# Altium PCB WIFI_BoardV4.10.PcbDoc (part 4 of 4)
Units mil, origin at the board's own origin, x right, y up, seen from the top; angles counter-clockwise.
Board outline 5550.17 x 2342.16 mil, 2 copper layers (Top Layer, Bottom Layer), stack 61.811 mil thick; 125 components, 90 nets, 434 pads, 155 vias.
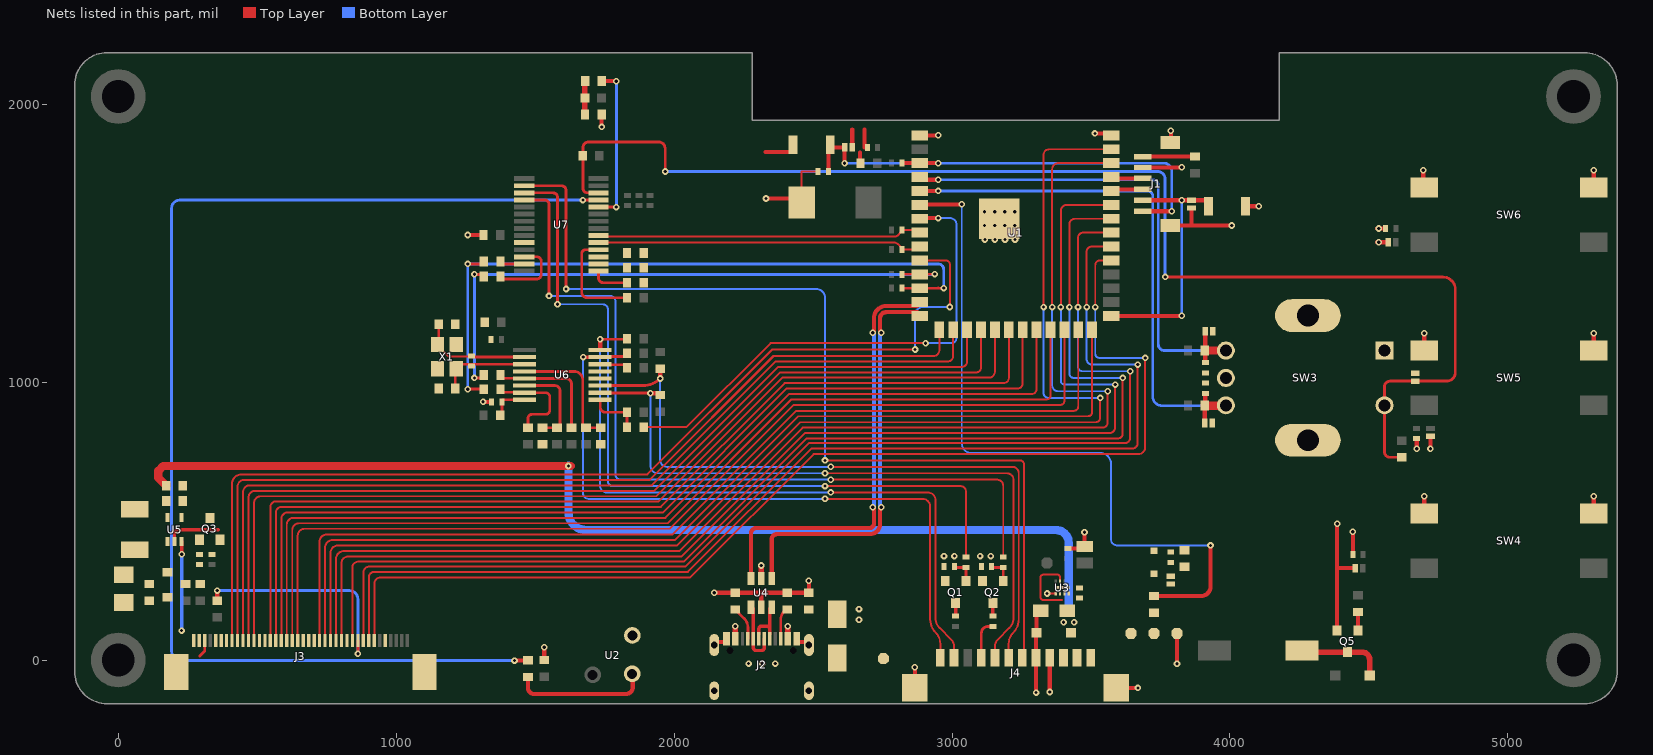
[diagram p2: the nets of this part, all layers, seen from the top]

## Via types
v1: diameter 23.62, hole 11.81, Top Layer to Bottom Layer, tented both sides, 155 vias

## Nets (pads, with @x,y where several pads share a name; then routed paths per layer and width w, separated by ;. In a path a pad name is that pad's centre, name@x,y a point inside that pad or via, vN(x,y) a via of type N, cw(c..) or ccw(c..) an arc to the next point about the centre after c; other vN are vias at no path point) (continued)
ENC_CHA: C1.2 D13.2 R3.1 SW3.A U1.4 | length 1887.1
  Top Layer w10: R3.1@3911.4,1111.83 R3.1@3911.4,1113.78
  Top Layer w15: U1.4@2884.64,1737.71 2894.64,1727.71 v1(2950.47,1727.71) ; C1.2@3911.4,1069.97 R3.1@3911.4,1111.83 ; R3.1@3911.4,1113.78 D13.2@3911.4,1182.61
  Top Layer w30: R3.1@3911.4,1113.78 SW3.A@3985.35,1113.78
  Bottom Layer w10: v1(2950.47,1727.71) 3721.36,1727.71 cw(c3721.36,1706.78) 3742.29,1706.78 3742.29,1135.88 ccw(c3764.77,1135.88) 3764.77,1113.4 SW3.A@3985.3,1113.4
ENC_CHB: C6.2 D12.2 R53.2 SW3.B U1.5 | length 2033.6
  Top Layer w15: U1.5@2884.64,1687.71 v1(2950.47,1687.71) ; D12.2@3909.4,853 3909.4,914.97 3911.35,916.93 C6.2@3911.35,958.79
  Top Layer w30: R53.2@3909.4,914.97 SW3.B@3985.3,914.97
  Bottom Layer w10: v1(2950.47,1687.71) 3703.68,1687.71 cw(c3703.68,1669.28) 3722.12,1669.28 3722.12,948.45 ccw(c3755.59,948.45) 3755.59,914.97 SW3.B@3985.3,914.97
ENC_SW: D14.2 R2.2 R54.1 SW3.2 U7.26 | length 4742.1
  Top Layer w10: U7.26@1728.35,1680.91 1688.71,1680.91 cw(c1688.71,1697.64) 1671.97,1697.64 1671.97,1843.38 cw(c1692.6,1843.38) 1692.6,1864 1944.73,1864 cw(c1944.73,1840.73) 1968,1840.73 v1(1968,1757.71) ; v1@3766.83,1378 4766,1378 cw(c4766,1333) 4811,1333 4811,1035 cw(c4779.54,1035) 4779.54,1003.54 D14.2@4667.01,1003.54 4576,1003.54 ccw(c4576,983.71) 4556.17,983.71 SW3.2@4556.17,916.55 4556.17,748.91 ccw(c4575.57,748.91) 4575.57,729.5 R54.1@4618.07,729.5
  Bottom Layer w10: v1(1968,1757.71) 3739.83,1757.71 cw(c3739.83,1730.71) 3766.83,1730.71 v1(3766.83,1378.36)
ESP_EN: C5.2 D4.2 J1.6 R1.1 SW1.1 U1.3 | length 1767.3
  Top Layer w15: C5.2@2555.36,1758 2555.36,1827.8 2561.99,1827.8 cw(c2578.72,1827.8) 2578.72,1844.53 D4.2@2613.43,1844.53 v1(2613.43,1787.71) ; R1.1@2819.99,1787.71 U1.3@2884.64,1787.71 v1(2950.47,1787.71) ; J1.6@3685.99,1614.57 v1(3790.64,1614.57)
  Bottom Layer w10: v1(2613.43,1787.71) v1(2950.47,1787.71) 3761.66,1787.71 cw(c3761.66,1758.73) 3790.64,1758.73 v1(3790.64,1614.57)
ESP_IO0: D8.2 J1.5 SW2.1 U1.27 | length 903.8
  Top Layer w15: U1.27@3573.61,1237.71 3574.18,1238.29 v1@3826.47,1238.29 ; J1.5@3685.99,1653.94 v1(3826.47,1653.94) D8.2@3861.48,1653.94 SW2.1@3921.56,1653.94
  Bottom Layer w10: v1(3826.47,1238.86) v1(3826.47,1653.94)
ESP_RXD0: J1.4 U1.36 | length 115.6
  Top Layer w15: U1.36@3573.61,1687.71 cw(c3579.21,1687.71) 3579.21,1693.31 J1.4@3685.99,1693.31
ESP_RXD1: J4.2 R25.1 U6.16 | length 2493.5
  Top Layer w7: v1(2564,603) 2913.23,603 cw(c2913.23,576) 2940.23,576 2940.23,151.46 ccw(c2990.94,151.46) 2955.08,115.6 2997.15,73.54 cw(c2973.19,49.57) 3007.08,49.57 J4.2@3007.08,8.31
  Top Layer w10: v1(1733.76,1154.23) R25.1@1830.52,1154.23
  Top Layer w15: U6.16@1734.17,1117.01 v1@1734.17,1153.82
  Bottom Layer w7: v1@1734,1159.03 1734,625.07 ccw(c1756.07,625.07) 1756.07,603 v1(2564,603)
ESP_RXD2: J4.6 R37.1 U6.11 | length 2557.9
  Top Layer w7: v1(2564,695) 3217.18,695 cw(c3217.18,672) 3240.18,672 3240.18,146.14 cw(c3173.53,146.14) 3220.66,99.01 ccw(c3261.05,58.62) 3203.93,58.62 J4.6@3203.93,8.31
  Top Layer w10: U6.11@1734.17,987.37 1888.13,987.37 ccw(c1888.13,1074.87) 1938.7,1003.46 ccw(c1888.13,1074.87) v1(1950,1013) ; R37.1@1950,1036.5 R37.1@1961.33,1047.83
  Top Layer w15: v1(1950,1013) R37.1@1950,1048.21
  Bottom Layer w7: v1(1950,1013) 1950,720.02 ccw(c1975.02,720.02) 1975.02,695 v1(2564,695)
ESP_TXD0: J1.3 U1.37 | length 115.3
  Top Layer w15: U1.37@3573.61,1737.71 ccw(c3578.64,1737.71) 3578.64,1732.68 J1.3@3685.99,1732.68
ESP_TXD1: J4.1 R29.2 U6.15 | length 2484.8
  Top Layer w7: v1(2543,580) 2893.14,580 cw(c2893.14,551.52) 2921.62,551.52 2921.61,146.14 ccw(c2988.26,146.14) 2941.13,99.01 cw(c2900.75,58.62) 2957.86,58.62 J4.1@2957.86,8.31
  Top Layer w10: v1(1672.89,1090) v1@1673.01,1089.87 ; U6.15@1734.04,1089.87 U6.15@1734.17,1089.74 1736.04,1091.61 1820.52,1091.61 1830.52,1101.61 R29.2@1830.52,1103.72
  Top Layer w13: v1@1673.01,1089.87 U6.15@1734.04,1089.87
  Bottom Layer w7: v1@1673,1090 v1(1672.89,1090) 1672.77,1090 1672.77,599.15 ccw(c1691.92,599.15) 1691.92,580 v1(2543,580)
ESP_TXD2: J4.5 R50.2 U6.10 | length 2479.9
  Top Layer w7: v1(2543,672) 3197.06,672 cw(c3197.06,647.5) 3221.56,647.5 3221.56,151.46 cw(c3170.85,151.46) 3206.71,115.6 3164.64,73.54 ccw(c3188.61,49.57) 3154.71,49.57 J4.5@3154.71,8.31
  Top Layer w10: U6.10@1734.17,961.78 1735.06,960.89 1914.11,960.89 v1(1915,960) ; R50.2@1943.38,960 R50.2@1950,953.38
  Top Layer w15: v1(1915,960) R50.2@1943.38,960
  Bottom Layer w7: v1(1915,960) 1915,698.21 ccw(c1941.21,698.21) 1941.21,672 v1(2543,672)
GND: C1.1 C2.2 C3.1 C4.1 C5.1 C6.1 C7.2 C8.1 C9.2 C10.1 C11.1 C12.1 C13.1 C14.1 C15.1 C16.2 C17.1 C18.1 C19.1 C20.1 C21.1 C22.1 C23.1 C24.2 C25.1 C26.1 D2.1 D4.1 D5.1 D6.1 D7.1 D8.1 D9.1 D10.1 D12.1 D13.1 D14.1 J1.2 J1.MP1 J1.MP2 J2.A1/B12 J2.B1/A12 J2.S1 J2.S2 J2.S3 J2.S4 J3.3 J3.5 J3.6 J3.7 J3.13 J3.14 J3.21 J3.22 J3.23 J3.29 J3.36 J3.MP1 J3.MP2 J4.8 J4.9 J4.MP1 J4.MP2 P3.1 Q1.2 Q2.2 Q3.2 Q5.2 R5.2 R6.2 R10.1 R18.1 R24.1 R26.2 R33.1 R35.1 R41.2 R42.2 R45.2 R48.1 R49.1 SW1.2 SW2.2 SW3.1 SW3.COM SW3.S1 SW3.S2 SW4.3 SW4.4 SW5.3 SW5.4 SW6.3 SW6.4 U1.1 U1.40 U1.41 U2.3 U3.5 U3.9 U4.2 U5.2 U6.12 U6.13 U7.10 X1.2 X1.4 | length 4051.9
  Top Layer w7: C2.2@2459.23,1660.42 2459.23,1758 C5.1@2518.36,1758 ; v1(3342.05,239.29) U3.5@3372.99,239.29
  Top Layer w10: 293.54,14.25 311.25,31.96 J3.3@311.25,70.08
  Top Layer w12: U5.2@202.69,426.27 202.69,454.04 cw(c216.87,454.04) 216.87,468.22 359.45,468.22
  Top Layer w15: v1(1257.97,1529.24) C24.2@1314.34,1529.24 ; v1(1312.84,928.78) C23.1@1343.84,928.78 ; C16.2@1532.99,-0.18 v1(1532.99,46) ; v1(1739.41,1918) R26.2@1739.41,1962.89 ; J2.S4@2144.49,53.95 2144.49,54.99 2153.93,64.43 2184.47,64.43 2188.78,68.74 J2.A1/B12@2188.78,76.39 ; v1(2144.49,241.75) R5.2@2220.28,241.75 2220.28,241.97 2313.79,241.97 ; U4.2@2313.79,190.4 2313.79,241.97 ; v1@2328.47,1658 cw(c2330.89,1658) v1(2330.89,1660.42) C2.2@2459.23,1660.42 ; 2328.47,1827.8 SW1.2@2428.13,1827.8 ; J2.B1/A12@2445.06,64.43 J2.S1@2475.6,64.43 ; v1(2485.04,285) C11.1@2485.04,241.75 R6.2@2407.35,241.75 2407.35,241.97 2313.79,241.97 ; D4.1@2640.99,1844.53 2640.99,1908.34 ; C4.1@2668.99,1787.71 2668.99,1826.28 ; 2685.49,1844.53 2685.49,1908.34 ; v1@2864.47,-24 cw(c2864.47,-25.86) v1(2866.33,-25.86) J4.MP1@2866.33,-100.35 ; U1.1@2884.64,1887.71 v1(2950.47,1887.71) ; v1@3300.47,-119 ccw(c3300.47,-117.12) v1(3302.35,-117.12) J4.8@3302.35,8.31 3302.35,96.26 cw(c3303.98,96.26) D2.1@3303.98,97.89 3303.98,161.79 cw(c3320.07,161.79) C9.2@3320.07,177.89 ; v1@3349.47,-117.12 ccw(c3349.47,-115.03) v1(3351.57,-115.03) J4.9@3351.57,8.31 ; C8.1@3416.96,401.61 3470.91,401.61 ccw(c3470.91,407.67) C7.2@3476.96,407.67 ; v1(3476.61,460) 3476.61,414.09 C7.2@3480,410.7 ; v1(3514.19,1894.71) U1.40@3573.61,1894.71 ; J4.MP2@3590.73,-100.35 v1(3668.83,-100.35) cw(c3668.83,-102) v1@3670.47,-102 ; J1.2@3685.99,1772.05 3686.42,1772.48 3825.77,1772.48 v1(3826.2,1772.91) ; J1.MP2@3785.4,1563.39 3861.48,1563.39 ; J1.MP1@3785.4,1862.6 ccw(c3785.4,1864.68) 3787.47,1864.68 v1(3787.47,1904) ; v1(3809.51,-13.59) P3.1@3809.51,95.89 ; D8.1@3861.48,1626.38 3861.48,1563.39 ; v1(4006.47,1563.39) 3861.48,1563.39 ; SW2.2@4056.53,1632.53 v1(4103.47,1632.53) ; Q5.2@4385.59,106.87 4385.59,330.55 ; v1(4385.59,490) 4385.59,330.55 ; C12.1@4442.19,380.2 v1(4442.19,462) ; D5.1@4450.91,330.55 4385.59,330.55 ; v1@4530,1502.97 D7.1@4565.09,1502.97 ; v1@4530,1552.55 C14.1@4560.3,1552.55 ; v1(4671.9,759.89) C13.1@4671.9,796.72 ; SW6.4@4695.47,1700 v1(4695.47,1762.2) ; SW4.4@4698.99,527.4 v1(4698.99,589.6) ; SW5.4@4698.99,1113.61 v1(4698.99,1175.81) ; v1(4721.47,759.89) D6.1@4721.47,805.44 ; SW4.3@5309.22,527.4 v1(5309.22,589.6) ; SW5.3@5309.22,1113.61 v1(5309.22,1175.81) ; SW6.3@5309.22,1699.82 v1(5309.22,1762.02)
  other v1: 2971.19,374.11 3008.67,373.94 3101.09,374.11 3139.57,373.94 4535,1502.97 3118.48,1512.88 3154.54,1512.88 3190.6,1512.88 3226.67,1512.88 4535,1552.55 3117.28,1563 3153.34,1563 3189.41,1563 3225.47,1563 3117.28,1612.71 3153.34,1612.71 3189.41,1612.71 3225.47,1612.71
HC_SET: J4.7 U7.2 | length 3470.4
  Top Layer w7: v1(2543,718) 3244.18,718 cw(c3244.18,702.78) 3259.4,702.78 3259.4,686.16 3259.4,35.2 J4.7@3253.14,8.31
  Top Layer w10: U7.2@1460.63,1706.5 1594.27,1706.5 cw(c1594.27,1689.34) 1611.42,1689.34 v1(1611.42,1335)
  Bottom Layer w7: v1(1611.42,1335) 2511.73,1335 cw(c2511.73,1303.73) 2543,1303.73 v1(2543,718)
I2C_SCL: R30.1 R46.1 R51.1 U1.11 | length 2231.3
  Top Layer w10: v1(1281.78,1015.05) R30.1@1315.05,1015.05 ; v1(1281.78,1387.5) 1307.84,1387.5 cw(c1307.84,1380) R46.1@1315.34,1380 ; R51.1@2819.51,1387.71 U1.11@2884.64,1387.71 ; U1.11@2872.72,1388.09 v1@2938.25,1388.09
  Bottom Layer w10: v1(1281.78,1015.05) v1(1281.78,1387.5) 2937.16,1387.5 ccw(c2937.16,1388.58) v1(2938.25,1388.58)
I2C_SDA: R11.1 R47.1 R52.1 U1.12 | length 2506.3
  Top Layer w10: v1(1257.97,974.7) R11.1@1315.34,974.7 ; v1(1257.97,1425.15) R47.1@1315.34,1425.15 ; R52.1@2819.99,1337.71 U1.12@2884.64,1337.71 2950.16,1337.71 ; 2950.16,1338.21 2950.16,1337.71 ; v1@2970.16,1337.71 2950.16,1337.71
  Bottom Layer w10: v1(1257.97,974.7) v1(1257.97,1425.15) 2950.01,1425.15 cw(c2950.01,1405) 2970.16,1405 v1(2970.16,1338.21)
INT_IRQ: R7.1 R39.1 U6.9 | length 186.9
  Top Layer w10: U6.9@1734.17,936.19 1734.17,910.05 ccw(c1752.84,910.05) 1752.84,891.38 R39.1@1830.53,891.38 R7.1@1830.52,837.67
INTA: R44.1 U1.8 U7.20 | length 1135
  Top Layer w7: U7.20@1732.13,1523.58 2791.84,1523.58 ; 2791.87,1523.58 ccw(c2791.87,1545.41) 2808.9,1531.74 R44.1@2814.49,1538.72 ; R44.1@2819.99,1547.71 U1.8@2866.75,1547.72
INTB: R43.1 U1.9 U7.19 | length 1149.1
  Top Layer w7: U7.19@1728.35,1501.77 2790.87,1501.77 cw(c2790.87,1477.71) 2809.63,1492.76 2814.49,1486.71 R43.1@2819.99,1477.71 U1.9@2866.75,1477.71
LCD_B3: J3.24 U1.25 | length 3569.9
  Top Layer w7: J3.24@724.65,70.08 724.65,426.99 cw(c748.82,426.99) 748.82,451.16 1993.91,451.16 2439.45,896.7 3438.49,896.7 ccw(c3438.49,912.53) 3454.32,912.53 U1.25@3454.32,1188.5
LCD_B4: J3.25 U1.26 | length 3599.5
  Top Layer w7: J3.25@744.35,70.08 744.35,404.7 cw(c771.11,404.7) 771.11,431.46 2002.07,431.46 2447.61,877 3489.44,877 ccw(c3489.44,891.88) 3504.32,891.88 U1.26@3504.32,1188.5
LCD_B5: J3.26 U1.39 | length 4689.7
  Top Layer w7: J3.26@764.05,70.08 764.05,386.29 cw(c789.51,386.29) 789.51,411.76 2010.23,411.76 2454.06,855.59 3517.06,855.59 ccw(c3517.06,871.53) 3533,871.53 v1(3533,943) ; v1(3329.42,1270) 3329.42,1817.54 cw(c3349.6,1817.54) 3344.47,1837.05 cw(c3349.6,1817.54) 3349.6,1837.71 ; 3350.3,1837.71 U1.39@3573.61,1837.71
  Bottom Layer w7: v1(3329.42,1270) 3329.42,960.44 ccw(c3346.87,960.44) 3346.87,943 v1(3533,943)
LCD_B6: J3.27 U1.38 | length 4607.4
  Top Layer w7: J3.27@783.75,70.08 783.75,363.36 cw(c812.45,363.36) 812.45,392.06 2018.39,392.06 2462.22,835.89 3541.73,835.89 ccw(c3541.73,854.15) 3560,854.15 v1(3560,967) ; v1(3360.42,1270) 3360.42,1765.85 cw(c3382.29,1765.85) 3376.9,1787.04 cw(c3382.29,1765.85) 3382.29,1787.71 ; 3382.99,1787.71 U1.38@3573.61,1787.71
  Bottom Layer w7: v1(3360.42,1270) 3360.42,987.99 ccw(c3381.41,987.99) 3381.41,967 v1(3560,967)
LCD_B7: J3.28 U1.35 | length 4433.5
  Top Layer w7: J3.28@803.45,70.08 803.45,348.83 cw(c826.97,348.83) 826.97,372.36 2026.55,372.36 2470.38,816.19 3564.97,816.19 ccw(c3564.97,838.22) 3587,838.22 v1(3587,991) ; v1(3391.42,1270) 3391.42,1614.66 cw(c3414.48,1614.66) 3414.48,1637.71 U1.35@3573.61,1637.71
  Bottom Layer w7: v1(3391.42,1270) 3391.42,1005.11 ccw(c3405.54,1005.11) 3405.54,991 v1(3587,991)
LCD_DE: J3.34 U1.31 | length 4085
  Top Layer w7: J3.34@921.55,70.08 921.55,274.38 cw(c944.34,274.38) 944.34,297.17 2057.9,297.17 2501.73,741 3670.41,741 ccw(c3670.41,765.59) 3695,765.59 v1(3695,1087) ; v1(3515.42,1270) 3515.42,1420.99 cw(c3532.15,1420.99) 3532.15,1437.71 U1.31@3573.61,1437.71
  Bottom Layer w7: v1(3515.42,1270) 3515.42,1101.84 ccw(c3530.26,1101.84) 3530.26,1087 v1(3695,1087)
LCD_DISP: J3.31 R8.1 | length 802.8
  Top Layer w10: v1(862.45,22.97) J3.31@862.45,70.08
  Top Layer w15: R8.1@356.55,213.39 v1(356.55,249.79)
  Bottom Layer w10: v1(356.55,249.79) 831.18,249.79 cw(c831.18,218.52) 862.45,218.52 v1(862.45,22.97)
LCD_G2: J3.15 U1.19 | length 3446.4
  Top Layer w7: J3.15@547.5,70.08 547.5,550.4 cw(c567.87,550.4) 567.87,570.78 1944.36,570.78 2389.91,1016.32 3133.98,1016.32 ccw(c3133.98,1036.4) 3154.06,1036.4 U1.19@3154.06,1188.24
LCD_G3: J3.16 U1.20 | length 3477.8
  Top Layer w7: J3.16@567.15,70.08 567.15,529.84 cw(c588.43,529.84) 588.43,551.13 1952.5,551.13 2398.04,996.67 3186.51,996.67 ccw(c3186.51,1014.48) 3204.32,1014.48 U1.20@3204.32,1188.5
LCD_G4: J3.17 U1.21 | length 3506.3
  Top Layer w7: J3.17@586.85,70.08 586.85,506.6 cw(c611.68,506.6) 611.68,531.43 1960.66,531.43 2406.2,976.97 3235.74,976.97 ccw(c3235.74,995.56) 3254.32,995.56 U1.21@3254.32,1188.5
LCD_G5: J3.18 U1.22 | length 3537.2
  Top Layer w7: J3.18@606.55,70.08 606.55,486.9 cw(c631.38,486.9) 631.38,511.73 1968.82,511.73 2414.36,957.27 3287.12,957.27 ccw(c3287.12,974.47) 3304.32,974.47 U1.22@3304.32,1188.5
LCD_G6: J3.19 U1.23 | length 3568.9
  Top Layer w7: J3.19@626.25,70.08 626.25,467.2 cw(c651.08,467.2) 651.08,492.03 1976.98,492.03 2422.52,937.57 3340.57,937.57 ccw(c3340.57,951.32) 3354.32,951.32 U1.23@3354.32,1188.5
LCD_G7: J3.20 U1.24 | length 3599
  Top Layer w7: J3.20@645.95,70.08 645.95,447.5 cw(c670.78,447.5) 670.78,472.33 1985.14,472.33 2430.68,917.87 3390.09,917.87 ccw(c3390.09,932.1) 3404.32,932.1 U1.24@3404.32,1188.5
LCD_HSYNC: J3.32 U1.33 | length 4241.5
  Top Layer w7: J3.32@882.15,70.08 882.15,313.88 cw(c904.83,313.88) 904.83,336.57 2041.58,336.57 2485.41,780.4 3621.43,780.4 ccw(c3621.43,799.97) 3641,799.97 v1(3641,1039) ; v1(3453.42,1270) 3453.42,1519.35 cw(c3471.79,1519.35) 3471.79,1537.71 U1.33@3573.61,1537.71
  Bottom Layer w7: v1(3453.42,1270) 3453.42,1054.72 ccw(c3469.13,1054.72) 3469.13,1039.01 v1(3641,1039)
LCD_PCLK: J3.30 U1.34 | length 4341.3
  Top Layer w7: J3.30@842.75,70.08 842.75,333.52 cw(c863.12,333.52) 863.12,353.89 2034.2,353.89 2478.03,797.73 3598.41,797.73 ccw(c3598.41,813.32) 3614,813.32 v1(3614,1015) ; v1(3422.42,1270) 3422.42,1568.01 cw(c3442.13,1568.01) 3442.13,1587.71 U1.34@3573.61,1587.71
  Bottom Layer w7: v1(3422.42,1270) 3422.42,1030.01 ccw(c3437.43,1030.01) 3437.43,1015 v1(3614,1015)
LCD_R3: J3.8 U1.10 | length 3761.2
  Top Layer w7: J3.8@409.75,70.08 409.75,633.48 cw(c444.15,633.48) 444.15,667.89 1904.14,667.89 2353.47,1117.22 v1(2867.22,1117.22) ; U1.10@2884.64,1437.71 2977.9,1437.71 cw(c2977.9,1423.15) 2992.47,1423.15 2992.47,1270.79 v1(2991.76,1270.07)
  Bottom Layer w7: v1(2867.22,1117.22) 2867.22,1241.42 cw(c2895.8,1241.42) 2895.8,1270 2991.68,1270 v1(2991.76,1270.07)
LCD_R4: J3.9 U1.15 | length 3363
  Top Layer w7: J3.9@429.35,70.08 429.35,623.45 cw(c454.18,623.45) 454.18,648.29 1912.26,648.29 2357.8,1093.83 2933.83,1093.83 ccw(c2933.83,1114.32) 2954.32,1114.32 U1.15@2954.32,1188.5
LCD_R5: J3.10 U1.16 | length 3393.6
  Top Layer w7: J3.10@449.05,70.08 449.05,603.75 cw(c473.88,603.75) 473.88,628.59 1920.42,628.59 2365.96,1074.13 2984.62,1074.13 ccw(c2984.62,1093.83) 3004.32,1093.83 U1.16@3004.32,1188.5
LCD_R6: J3.11 U1.17 | length 3423.8
  Top Layer w7: J3.11@468.75,70.08 468.75,584.05 cw(c493.58,584.05) 493.58,608.89 1928.58,608.89 2374.12,1054.43 3034.31,1054.43 ccw(c3034.31,1074.44) 3054.32,1074.44 U1.17@3054.32,1188.5
LCD_R7: J3.12 U1.18 | length 3455.1
  Top Layer w7: J3.12@488.45,70.08 488.45,564.35 cw(c513.28,564.35) 513.28,589.19 1936.74,589.19 2382.28,1034.73 3086.77,1034.73 ccw(c3086.77,1052.28) 3104.32,1052.28 U1.18@3104.32,1188.5
LCD_VSYNC: J3.33 U1.32 | length 4163.4
  Top Layer w7: J3.33@901.85,70.08 901.85,297.63 cw(c921.09,297.63) 921.09,316.87 2049.74,316.87 2493.57,760.7 3648.3,760.7 ccw(c3648.3,780.4) 3658.36,763.46 ccw(c3648.3,780.4) 3661.63,765.89 ccw(c3648.3,780.4) 3668,780.4 v1(3668,1063) ; v1(3484.42,1270) 3484.42,1469.23 cw(c3502.91,1469.23) 3502.91,1487.71 U1.32@3573.61,1487.71
  Bottom Layer w7: v1(3484.42,1270) 3484.42,1082.95 ccw(c3504.38,1082.95) 3504.38,1063 v1(3668,1063)
LED_A: C20.2 D11.1 J3.2
LED_K: J3.1 R10.2 U5.3 | length 320.4
  Top Layer w13: v1(228.28,380.49) U5.3@228.28,426.27
  Bottom Layer w13: v1(228,106) 228.14,106.14 228.14,380.35 v1(228.28,380.49)
MCU_BOOT: R16.2 U7.3 | length 2870.4
  Top Layer w7: v1(2543,626) 3029.82,626 cw(c3029.82,605.35) 3050.47,605.35 R16.2@3050.47,369.94
  Top Layer w10: U7.3@1460.63,1680.91 1564.93,1680.91 cw(c1564.93,1665.12) 1580.71,1665.12 v1(1580.71,1280)
  Bottom Layer w7: v1(1580.71,1280) 1743.92,1280 cw(c1743.92,1261.92) 1762,1261.92 1762,642.36 ccw(c1778.36,642.36) 1778.36,626 v1(2543,626)
MCU_RST: R17.2 U7.4 | length 2976.1
  Top Layer w7: v1(2564,649) 3161.37,649 cw(c3161.37,626) 3169.53,647.5 cw(c3161.37,626) 3184.37,626 3184.37,590.31 R17.2@3184.37,369.94
  Top Layer w10: U7.4@1460.63,1655.32 1533.92,1655.32 cw(c1533.92,1639.24) 1550,1639.24 v1(1550,1310)
  Bottom Layer w7: v1(1550,1310) 1770,1310 cw(c1770,1291.11) 1788.89,1291.11 1788.89,667.89 ccw(c1807.77,667.89) 1807.77,649 v1(2564,649)
MODE_0: R11.2 R12.1 U6.7 | length 368.8
  Top Layer w10: R11.2@1375.34,974.7 1375.34,973.36 1385.34,963.36 1460.93,963.36 U6.7@1462.51,961.78 1537.94,961.78 cw(c1537.94,947) 1552.72,947 1552.72,898.59 cw(c1538.19,898.59) 1538.19,884.05 1489.11,884.05 ccw(c1489.11,869.69) 1474.75,869.69 R12.1@1474.75,835.76
MODE_1: R35.2 R36.1 U6.6 | length 328.2
  Top Layer w10: U6.6@1462.51,987.37 1570.79,987.37 cw(c1570.79,968.22) 1589.95,968.22 1589.95,845.76 1579.95,835.76 R35.2@1526.73,835.76
MODE_2: R30.2 R31.1 U6.5 | length 430.5
  Top Layer w10: R30.2@1375.34,1025.76 1375.34,1024.12 1385.34,1014.12 1461.35,1014.12 U6.5@1462.51,1012.96 1610.79,1012.96 cw(c1610.79,992.68) 1631.06,992.68 R31.1@1631.06,835.76
MODE_3: R33.2 R34.1 U6.4 | length 456.8
  Top Layer w10: U6.4@1462.51,1038.56 1639.46,1038.56 cw(c1639.46,1006.46) 1671.57,1006.46 1671.57,845.76 1681.57,835.76 R34.1@1683.53,835.76 R33.2@1736.19,835.76
NetD3_1: D3.1 LS1.2 Q5.3 | length 315.7
  Top Layer w20: LS1.2@4259.51,28.13 Q5.3@4422.99,28.13 4475.88,28.13 cw(c4475.88,1.53) 4502.48,1.53 D3.1@4502.48,-56
NetD11_2: D11.2 L1.2 U5.1
NetJ1_1: J1.1 R4.2 | length 188.4
  Top Layer w15: J1.1@3685.99,1811.42 R4.2@3874.4,1811.42
NetJ2_A5: J2.A5 R5.1 | length 122.1
  Top Layer w10: R5.1@2220.28,181.75 2252.05,149.98 2252.12,149.91 cw(c2219.65,117.46) 2265.55,117.49 2265.55,117.42 J2.A5@2265.55,76.39
NetJ2_B5: J2.B5 R6.1 | length 115.3
  Top Layer w10: J2.B5@2383.66,76.39 2383.66,143.71 ; 2383.66,143.75 cw(c2431.77,143.75) 2394.85,174.6 R6.1@2407.35,181.75
NetLED1_2: LED1.2 R26.1 SB1.2 | length 120.6
  Top Layer w10: SB1.2@1679.41,2081.93 cw(c1680.37,2081.93) SB1.2@1680.37,2082.89
  Top Layer w20: R26.1@1679.41,1962.89 SB1.2@1679.41,2081.93
NetQ1_1: Q1.1 R16.1 R18.2 | length 93
  Top Layer w10: R18.2@3008.67,336.44 ccw(c3012.17,336.44) 3012.17,332.94 R16.1@3050.47,332.94 Q1.1@3050.47,283.79
NetQ1_3: Q1.3 R14.1 | length 47.2
  Top Layer w13: R14.1@3013.07,157.8 Q1.3@3013.07,205.05
NetQ2_1: Q2.1 R17.1 R48.2 | length 93
  Top Layer w10: R48.2@3142.57,336.44 ccw(c3146.07,336.44) 3146.07,332.94 R17.1@3184.37,332.94 Q2.1@3184.37,283.79
NetQ2_3: Q2.3 R15.1 | length 47.2
  Top Layer w13: R15.1@3146.97,157.8 Q2.3@3146.97,205.05
NetQ3_1: Q3.1 R22.1 R49.2
NetQ3_3: Q3.3 R9.1 U5.4
NetQ5_1: Q5.1 R28.2 | length 66
  Top Layer w15: Q5.1@4460.39,106.87 R28.2@4460.39,172.89
NetR7_2: R7.2 U1.7 | length 1815.7
  Top Layer w7: R7.2@1890.52,837.67 2044.67,837.67 2347.06,1140.06 v1(2905,1140.06) ; U1.7@2884.64,1587.71 cw(c2886.92,1587.71) U1.7@2886.92,1590
  Top Layer w15: U1.7@2886.92,1590 v1(2950.47,1590)
  Bottom Layer w7: v1(2905,1140.06) 2997.3,1140.06 ccw(c2997.3,1158.97) 3016.21,1158.97 3016.21,1566.73 ccw(c2992.95,1566.73) 2992.95,1590 v1(2950.47,1590)
NetR27_2: R27.2 U2.2 | length 491.6
  Top Layer w15: R27.2@1474.35,-61.34 1474.35,-99.88 ccw(c1496.47,-99.88) 1496.47,-122 1827.47,-122 ccw(c1827.47,-98) 1851.47,-98 1851.47,-51.6 ccw(c1849.44,-51.6) U2.2@1849.44,-49.57
NetR32_1: R32.1 U6.14 | length 83.9
  Top Layer w10: U6.14@1734.17,1064.15 1735.88,1062.44 R32.1@1817.4,1062.44
NetR40_1: R40.1 U7.18 | length 381.7
  Top Layer w10: U7.18@1728.35,1476.18 1681.55,1476.18 ccw(c1681.55,1462.43) 1667.8,1462.43 1667.8,1323.33 ccw(c1687.9,1323.33) 1687.9,1303.23 R40.1@1830.53,1303.23
NetR41_1: R41.1 U7.15 | length 136.7
  Top Layer w10: U7.15@1728.35,1399.41 1728.35,1374.38 ccw(c1745,1374.38) 1745,1357.72 R41.1@1830.53,1357.72
NetR42_1: R42.1 U7.16
NetR45_1: R45.1 U7.17
NetR46_2: R46.2 U7.12 | length 274.1
  Top Layer w10: R46.2@1375.34,1371 1506,1371 ccw(c1506,1386.98) 1521.97,1386.98 1521.97,1434.58 ccw(c1505.55,1434.58) 1505.55,1451 1492.05,1451 U7.12@1460.63,1450.59
NetR47_2: R47.2 U7.13 | length 88.8
  Top Layer w10: R47.2@1371.84,1425 U7.13@1460.63,1425
NRST: J4.4 R15.2 | length 143.4
  Top Layer w10: J4.4@3105.5,8.31 3105.5,96.26 cw(c3130.04,96.26) 3130.04,120.8 R15.2@3146.97,120.8
OSCI: C25.2 R13.1 U6.2 X1.1 | length 400.4
  Top Layer w7: X1.1@1149.51,1131.21 1189.02,1091.7 R13.1@1269.05,1091.7
  Top Layer w10: X1.1@1149.51,1131.21 ccw(c1149.51,1134.68) 1152.97,1134.68 C25.2@1152.97,1208.23 ; R13.1@1277.28,1090.47 1461.78,1090.47 U6.2@1462.51,1089.74
OSCO: C26.2 R13.2 U6.3 X1.3 | length 339.8
  Top Layer w10: C26.2@1212.97,976.79 1212.97,1045.07 cw(c1216.44,1045.07) X1.3@1216.44,1048.54 ; U6.3@1462.51,1064.15 1232.05,1064.15 X1.3@1225.05,1057.15 ; X1.3@1216.44,1048.54 cw(c1225.05,1048.54) X1.3@1225.05,1057.15 ; X1.3@1216.44,1048.54 X1.3@1225.05,1057.15
PIR_OUT: R27.1 U7.25 | length 4452.2
  Top Layer w10: R27.1@1466.69,-2 R27.1@1474.35,5.66 ; v1(1671.97,1654.75) 1671.97,1655.32 U7.25@1728.35,1655.32
  Top Layer w15: v1(1426,-2) R27.1@1466.69,-2
  Bottom Layer w10: v1(1426,-2) 226,-2 cw(c226,32) 192,32 192,1625.85 cw(c220.9,1625.85) 220.9,1654.75 v1(1671.97,1654.75)
PWR: C9.1 C10.2 C11.2 C19.2 D1.1 D2.2 J4.10 J4.11 L1.1 P4.1 R9.2 U3.3 U3.6 U3.7 U3.8 U5.5 | length 4075.8
  Top Layer w7: U3.3@3388.74,282.4 3388.74,296.59 ccw(c3377.36,296.59) 3377.36,307.97 3330.86,307.97 ccw(c3330.86,294.81) 3317.7,294.81 3317.7,227.82 ccw(c3329.63,227.82) 3329.63,215.89 3396.62,215.89
  Top Layer w30: C19.2@172.69,627.17 172.69,629.67 170.19,629.67 144.31,655.55 144.31,680.4 161.88,697.97 v1@1627.97,697.97
  Bottom Layer w30: v1@1620,700 1620,530.31 ccw(c1682.36,530.31) 1682.36,467.95 3373.64,467.95 cw(c3373.64,421.59) 3420,421.59 3420,186.88
  other v1: 3401.47,135.46 3439.24,135.46 2665.47,145 2665.47,183.41 1620,697.97
RST: C23.2 R38.2 U6.8 | length 133
  Top Layer w8: C23.2@1381.48,936.19 U6.8@1462.51,936.19
  Top Layer w10: R38.2@1374.33,880.55 ccw(c1374.33,887.05) 1380.84,887.05 C23.2@1380.84,928.78
SNS_IN: SB1.1 U7.24 | length 571
  Top Layer w10: U7.24@1728.35,1629.72 v1(1792.4,1629.79) v1(1792.4,1629.79) ; v1(1792.36,2082.89) ccw(c1792.36,2084) v1@1793.47,2084
  Top Layer w15: SB1.1@1740.37,2082.89 v1(1792.36,2082.89)
  Bottom Layer w10: v1(1792.4,1629.79) v1@1792.4,2082.89
TYPEC_N: U1.13 U4.6 | length 1547.2
  Top Layer w15: U4.6@2276.39,293.55 2276.39,454.76 cw(c2296.63,454.76) 2296.63,475 2704,475 ccw(c2704,490) 2719,489.95 v1@2719,548.07 ; v1@2719,1182.31 2719,1229 cw(c2763.71,1229) 2763.71,1273.71 2870.64,1273.71 ccw(c2870.64,1287.71) U1.13@2884.64,1287.71
  Bottom Layer w15: v1@2719,554.31 v1@2719,1173.69
  other v1: 2714.69,550 2714.69,1178
TYPEC_P: U1.14 U4.4 | length 1451.3
  Top Layer w15: U4.4@2351.19,293.55 2351.19,434.71 cw(c2369.48,434.71) 2369.48,453 2704,453 ccw(c2704,490) 2741,489.96 v1@2741,548.07 ; v1@2741,1182.31 2741,1229 cw(c2763.71,1229) 2763.71,1251.71 2870.64,1251.71 cw(c2870.64,1237.71) U1.14@2884.64,1237.71
  Bottom Layer w15: v1@2741,554.31 v1@2741,1173.69
  other v1: 2745.31,550 2745.31,1178
U_VBUS: D1.2 J2.A4/B9 J2.B4/A9 P2.1 U4.5 | length 137.7
  Top Layer w20: J2.A4/B9@2220.28,76.39 v1(2220.28,122) ; U4.5@2313.79,293.55 v1(2313.79,340) ; J2.B4/A9@2409.25,76.39 v1(2409.25,122)
  other v1: 2267.95,-12.77 2317.51,-12.77 2363.98,-12.77
USBD_N: J2.A7 J2.B7 U4.1 | length 234.3
  Top Layer w12: U4.1@2276.39,190.4 cw(c2276.39,181.55) 2285.24,181.55 2285.24,44 ccw(c2294.97,44) 2294.97,34.27 2314.76,34.27 ccw(c2314.76,44.11) 2324.61,44.11 J2.A7@2324.61,76.39
USBD_P: J2.A6 J2.B6 U4.3 | length 173.3
  Top Layer w12: J2.A6@2304.92,92.51 2304.92,112.16 cw(c2314.76,112.16) 2314.76,122 2332.27,122 cw(c2332.27,109.98) 2344.29,109.98 ; J2.B6@2344.29,92.51 2344.29,183.5 cw(c2351.19,183.5) U4.3@2351.19,190.4
VCC_12V: J4.12 P5.1 R23.2
VCC_ADC: C15.2 D9.2 D10.2 R23.1 R24.2 U1.6 | length 2603.4
  Top Layer w15: U1.6@2884.64,1637.71 2885.78,1638.86 3033.86,1638.86 v1(3035,1640) ; R23.1@3726.76,230.51 3896.81,230.51 ccw(c3896.81,263.7) 3930,263.7 v1@3930,412.27
  Bottom Layer w7: v1(3035,1640) 3035,779.97 ccw(c3070.15,779.97) 3070.15,744.83 3533.14,744.83 cw(c3533.14,706.12) 3571.84,706.12 3571.84,434.9 ccw(c3594.39,434.9) 3594.39,412.35 v1(3930.08,412.35)
pads on no net: J2.A8 J2.B8 J2.MH J3.35 J3.37 J3.38 J3.39 J3.40 U1.28 U1.29 U1.30 U7.6 U7.7 U7.8 U7.11 U7.14 U7.27 U7.28

## Polygon pours and split planes (outlines as drawn)
GND on Top Layer "NONET_L-01_P-001" (solid, remove dead copper, pour order 12): -156.47,-41.36 -156.47,2071.73 -156.47,2068.66 cw(c-40.09,2068.66) -40.09,2185.04 2280.48,2185.04 2280.48,1941.42 4177.38,1941.42 4177.38,2185.04 5275.59,2185.04 cw(c5275.59,2066.93) 5393.7,2066.93 5393.7,-39.63 cw(c5276.21,-39.63) 5276.21,-157.12 -40.71,-157.12 cw(c-40.71,-41.36)
PWR on Top Layer "NONET_L-01_P-001" (solid, pour order 10): 187.69,496.15 10.84,496.15 10.84,714 187.69,714
PWR on Top Layer "NONET_L-01_P-001" (solid, pour order 5): 2668.38,213.84 cw(c2668.38,196.75) 2685.47,196.75 2685.47,130.48 cw(c2670.4,130.48) 2670.4,115.42 2483.02,115.42 cw(c2483.02,130.89) 2467.54,130.89 2467.54,196.75 cw(c2484.96,196.75) 2481.57,213.84
GND on Bottom Layer "NONET_L-01_P-001" (solid, remove dead copper, pour order 11): -156.47,-41.36 -156.47,2071.73 -156.47,2068.66 cw(c-40.09,2068.66) -40.09,2185.04 2280.48,2185.04 2280.48,1941.42 4177.38,1941.42 4177.38,2185.04 5275.59,2185.04 cw(c5275.59,2066.93) 5393.7,2066.93 5393.7,-39.63 cw(c5276.21,-39.63) 5276.21,-157.12 -40.71,-157.12 cw(c-40.71,-41.36)

## Other copper
Top Layer:
  rectangle net GND: 344.74,46.46 395.95,93.7
  rectangle net GND: 2655.99,1832.03 2704.49,1860.53
  rectangle net NetQ3_1: 279.59,371.49 349.59,401.59
  rectangle net NetQ3_1: 275.96,371.49 308.24,450.88
  rectangle net NetQ3_3: 217.69,493.4 345.65,589.4
  rectangle net LED_A: 89.2,183.39 207.68,242.11
  rectangle net NetD11_2: 10.84,367.17 183.99,443
  rectangle net NetD11_2: 170.21,316.17 183.99,443
  rectangle net NetR42_1: 1691.93,1416.14 1845.53,1433.86
  rectangle net NetR45_1: 1691.93,1441.73 1845.53,1459.45
  rectangle net GND: 3445.49,250.34 3688.87,268.34
  rectangle net GND: 2668.99,1832.03 2704.49,1857.03
  rectangle net GND: 2655.99,1770.21 2685.99,1860.53
  rectangle net GND: 3078.93,1487.71 3265.47,1660.55
  rectangle net GND: 3369.06,232.5 3376.93,266.75
  rectangle net GND: 3371.02,254.94 3457.99,266.75
  rectangle net GND: 3898.9,986.84 3985.3,1041.97
  region net 3V3_WIFI: 224.83,191.99 ccw(c237.94,191.99) 237.94,178.88 258.39,178.88 291.95,178.88 cw(c291.95,145.79) 325.04,145.79 325.04,-53.18 336.85,-53.18 336.85,107.8 337.11,110.35 339.06,115.07 342.67,118.68 347.39,120.64 349.94,120.89 376.25,120.89 377.82,120.89 380.72,122.09 382.94,124.31 384.14,127.21 384.14,128.78 384.14,172.99 384.14,175.06 382.56,178.88 379.63,181.81 375.81,183.39 340.04,183.39 337.12,183.68 331.71,185.92 329.24,188.39 329.05,188.39 329.05,188.58 327.57,190.06 325.33,195.47 325.04,198.39 325.04,242.11 224.83,242.11
  region net LED_K: 115.9,123 cw(c115.89,169.29) 69.61,169.29 69.61,242.11 -15.4,242.11 -15.4,120.54 -12.36,117.94 -9.32,118.43 9.32,118.43 27.73,115.51 45.46,109.75 62.07,101.29 77.15,90.33 90.33,77.15 101.29,62.07 109.24,46.45 217.04,46.46 277.85,46.46 277.85,111.9 275.74,116.99 271.85,120.89 266.76,123
  region net 3V3_WIFI: 3885.49,-7.3 3885.49,138.02 cw(c3904.47,138.02) 3904.47,157 3983.47,157 cw(c3983.47,136.87) 4003.6,136.87 4003.6,-7.3
  region net U_VBUS: 2523.83,16.83 2523.83,56.36 2763.51,56.36 cw(c2763.51,32.24) 2787.63,32.24 2787.63,-25.04 cw(c2765.73,-25.04) 2765.73,-46.95 2227.42,-46.95 cw(c2227.42,-27.99) 2208.46,-27.99 2208.46,12.77 ccw(c2208.47,27.65) 2223.35,27.65 2223.35,41.16 ccw(c2208.48,41.16) 2213.61,55.12 2213.61,100.01 2232.09,100.01 2232.09,37.71 ccw(c2252.12,37.71) 2252.12,17.68 2376.98,17.68 ccw(c2376.98,38.14) 2397.44,38.14 2397.44,100.01 2416.11,100.01 2416.11,55.4 ccw(c2416.11,45.56) 2406.27,45.56 2406.27,14.21 ccw(c2424.24,14.2) 2424.24,-3.77 2503.23,-3.77 ccw(c2503.23,16.83)
  region net PWR: 3439.25,239.29 3661.08,239.29 cw(c3661.08,217.9) 3682.47,217.9 3682.47,74.8 cw(c3664.81,74.8) 3664.8,57.13 3465.74,57.13 3465.74,-23.58 3385.03,-23.58 3385.03,246.08 3439.25,246.08
  region net 3V3_WIFI: 3653.33,282.18 ccw(c3653.33,305.05) 3676.21,305.05 3676.21,585.7 cw(c3703.5,585.7) 3703.51,613 3850,613 ccw(c3850,642.39) 3879.4,642.4 3879.39,1182.61 ccw(c3860,1182.61) 3860,1202 3795.77,1202 ccw(c3795.77,1182.23) 3776,1182.23 3776,746 cw(c3749,746) 3749,719 3607,719 ccw(c3607,690) 3578,690 3578,397.94 cw(c3553.57,397.94) 3553.57,373.51 3404.46,373.51 cw(c3404.51,393.22) 3384.8,393.27 3384.8,443 ccw(c3365.8,443) 3365.8,462 3289,462 ccw(c3289,444) 3271,444 3271,321.74 3377.36,321.74 cw(c3377.36,298.54) 3400.55,298.54 3400.55,275.61 3439.25,275.61 3439.25,282.18
  region net VCC_ADC: 3800.06,296.26 3850.71,296.26 ccw(c3850.71,307.21) 3861.67,307.21 3861.67,348.61 ccw(c3850.69,348.61) 3850.69,359.59 3720,359.59 ccw(c3720,348.85) 3709.26,348.84 3709.26,215.51 3744.26,215.51 3744.26,283.97 cw(c3756.55,283.97) 3756.55,296.26
  region net VCC_12V: 3730.25,-23.58 ccw(c3730.25,-7.39) 3746.44,-7.39 3746.44,185.51 3707.07,185.51 3707.07,56.59 cw(c3690.67,56.59) 3690.67,40.2 3483.46,40.2 3483.46,-23.58
  pour cut-out: 3404.46,387.98 3404.46,480.84 3557.61,480.84 3557.61,387.98
  pour cut-out: -9.55,346.78 -9.55,496.15 350.76,496.15 350.76,346.78
  pour cut-out: 1858.54,1179.82 1858.54,1183.73 1862.56,1183.73 1862.56,1179.82
  pour cut-out: 1775.51,1005.48 1775.51,1047.42 1779.53,1047.42 1779.53,1005.48
  pour cut-out: 1497.05,1492.91 1497.05,1510.63 1501.07,1510.63 1501.07,1492.91
  pour cut-out: 2953.99,388.94 2953.99,409.31 3161.87,409.31 3161.87,388.94
  pour cut-out: 2240.16,458.18 2240.16,468.18 2258.55,468.18 2258.55,458.18
  region net 3V3_WIFI: 2791.99,1575.21 2578.13,1575.21 2578.13,1757 2713.99,1757 2713.99,1822.03 2713.99,1905.43 2840.47,1905.43 2840.47,1855.43 2914.16,1855.43 2914.16,1820 2791.99,1820
  pour cut-out: 344.74,93.7 344.74,103.7 927.45,103.7 927.45,93.7
  region net LED_A: 207.68,183.39 207.97,180.47 210.2,175.06 214.34,170.92 219.75,168.68 222.68,168.39 281.86,168.39 289.04,165.42 294.53,159.93 297.5,152.75 297.5,148.87 297.5,46.46 295.34,46.46 287.85,46.46 285.69,46.46 285.69,116.99 285.25,121.48 281.82,129.78 275.47,136.12 267.17,139.56 262.69,140 116.97,140 111.01,141.18 105.41,143.51 100.36,146.88 96.07,151.17 92.7,156.21 90.38,161.82 89.2,167.77 89.2,170.8 89.2,242.11 207.68,242.11
Bottom Layer:
  region net 3V3_WIFI: 3573.91,372 3978,372 cw(c3978,343) 4007,343 4007,95.41 cw(c3981.15,95.41) 3981.15,69.56 3906.44,69.56 cw(c3906.44,99) 3877,99 3877,258 ccw(c3857,258) 3857,278 3572.98,278 cw(c3572.98,297.98) 3553,297.98 3553,351.09 cw(c3573.91,351.09)
  region net PWR: 2630.47,177.78 cw(c2655.47,177.78) 2655.47,202.78 3426.81,202.78 cw(c3427.08,176.62) 3453.23,176.89 3453.23,117.76 cw(c3425.47,117.76) 3425.47,90 2653.97,90 cw(c2653.97,113.5) 2630.47,113.5
  region net U_VBUS: 2195.47,204.3 2195.47,321.4 cw(c2227.47,321.4) 2227.47,353.4 2413.41,353.4 cw(c2413.74,319.67) 2447.47,320 2447.47,79.21 2447,75.6 2447,52.44 2443.3,50.91 2441.12,53.09 2432.96,56.47 2424.13,56.47 2415.97,53.09 2409.72,46.84 2406.34,38.68 2406.34,29.85 2409.72,21.69 2415.97,15.44 2424.13,12.06 2432.96,12.06 2441.12,15.44 2443.47,17.79 2447.47,16.14 2447.47,-6 2447.47,-9.15 2446.24,-15.33 2443.83,-21.16 2440.33,-26.4 2435.87,-30.86 2430.63,-34.36 2424.81,-36.77 2418.62,-38 2415.47,-38 2229.47,-38 2226.12,-38 2219.56,-36.69 2213.37,-34.13 2207.8,-30.41 2203.06,-25.67 2199.34,-20.11 2196.78,-13.92 2195.47,-7.35 2195.47,-4 2195.47,11.33 2196.57,12.06 2205.4,12.06 2213.56,15.44 2219.81,21.69 2223.19,29.85 2223.19,38.68 2219.81,46.84 2213.56,53.09 2205.4,56.47 2199.47,56.47 2195.47,60.02 2195.47,75.6

## Silkscreen, mask and mechanical layers (free items; w line width, h text height)
Top Overlay:
  lines w5: 316.48,173.11 75.48,173.11 75.48,341.11 221.33,341.11 221.33,312.51 316.48,312.51 335.55,312.51 335.55,261.39 ; 335.55,275 445,275 ; 1066.49,811.56 1065,811.56 ; 1254.47,1119.7 1299.34,1119.7 1299.34,1059.99 1405,1059.99 1405,846.81 1283.75,846.81 ; 1283.75,993.73 1283.75,846.81 ; 445,275 645,275 645,165 445,165 445,275 ; 1065,811.56 1065,916.81 1131.49,916.81 1131.49,846.81 1231.97,846.81 ; 1065,811.56 1110,811.56 1110,631.81 1231.97,631.81 1231.97,846.81 ; 1231.97,846.81 1283.75,846.81
  text "3V3" at 3360.48,385.08 h50 r90
  text "PWR" at 3656.31,135.29 h50 r90
  text "VBUS" at 2767.14,47.4 h50 r90
  text "GND" at 3822.73,-27.21 h50 r90
  text "12V" at 3745.18,-32.53 h50 r90
Dimensions:
  lines w5: 3582.68,2307.85 3674.85,2307.85 3674.85,2263.78
Board Outline:
  lines w10: -156.47,2068.66 cw(c-40.09,2068.66) -40.09,2185.04 2280.48,2185.04 2280.48,1941.42 4177.38,1941.42 4177.38,2185.04 5275.59,2185.04 cw(c5275.59,2066.93) 5393.7,2066.93 5393.7,-39.63 cw(c5276.21,-39.63) 5276.21,-157.12 -40.71,-157.12 cw(c-40.71,-41.36) -156.47,-41.36 -156.47,2071.73
Fabrication:
  drawing of 191 lines, arcs and shapes, not listed
  text "Layer" at 6135.34,2595 h60
  text "Name" at 6545.26,2595 h60
  text "Material" at 7475,2595 h60
  text "Thickness" at 8334.77,2595 h60
  text "Constant" at 8984.6,2595 h60
  text "Board Layer Stack" at 9554.46,2595 h60
  text "Top Overlay" at 6545.26,2475 h60
  text "Top Solder" at 6545.26,2355 h60
  text "Solder Resist" at 7475,2355 h60
  text "0.010mm" at 8334.77,2355 h60
  text "3.5" at 8984.6,2355 h60
  text "1" at 6135.34,2235 h60
  text "Top Layer" at 6545.26,2235 h60
  text "0.035mm" at 8334.77,2235 h60
  text "Dielectric 1" at 6545.26,2115 h60
  text "FR-4" at 7475,2115 h60
  text "1.500mm" at 8334.77,2115 h60
  text "4.6" at 8984.6,2115 h60
  text "2" at 6135.34,1995 h60
  text "Bottom Layer" at 6545.26,1995 h60
  text "0.035mm" at 8334.77,1995 h60
  text "Bottom Solder" at 6545.26,1875 h60
  text "Solder Resist" at 7475,1875 h60
  text "0.010mm" at 8334.77,1875 h60
  text "3.5" at 8984.6,1875 h60
  text "Bottom Overlay" at 6545.26,1755 h60
  text "Total board thickness:" at 6135.34,1635 h60
  text "1.590mm" at 8334.77,1635 h60
Mechanical 13:
  circle w10: c4250.58,1013.4 r492.13
Drill Drawing:
  circle w10: c-441.5,3683.33 r33.33
  circle w10: c-441.5,3533.33 r20
  circle w10: c-441.5,3533.33 r33.33
  lines w10: -474.83,3200 -408.16,3200 -408.16,3266.67 -474.83,3266.67 -474.83,3200 ; -474.83,3350 -408.16,3350 -408.16,3416.67 -474.83,3416.67 -474.83,3350 ; -474.83,3800 -474.83,3816.67 -458.16,3833.33 -474.83,3850 -474.83,3866.67 -458.16,3866.67 -441.5,3850 -424.83,3866.67 -408.16,3866.67 -408.16,3850 -424.83,3833.33 -408.16,3816.67 -408.16,3800 -424.83,3800 -441.5,3816.67 -458.16,3800 -474.83,3800 ; -474.83,3966.67 -458.16,3966.67 -458.16,3950 -424.83,3950 -424.83,3966.67 -408.16,3966.67 -408.16,4000 -424.83,4000 -424.83,4016.67 -458.16,4016.67 -458.16,4000 -474.83,4000 -474.83,3966.67 ; -474.83,4100 -441.5,4116.67 -408.16,4100 -424.83,4133.33 -408.16,4166.67 -441.5,4150 -474.83,4166.67 -458.16,4133.33 -474.83,4100 ; -474.83,4283.33 -441.5,4250 -408.16,4283.33 -441.5,4316.67 -474.83,4283.33 ; -461.5,3363.33 -421.5,3363.33 -421.5,3403.33 -461.5,3403.33 -461.5,3363.33
  lines w15: -534.62,3155 7125.27,3155 ; -534.62,4355 7125.27,4355 ; 16.25,3005 16.25,4505 ; 606.1,3005 606.1,4505 ; 1725.77,3005 1725.77,4505 ; 2231.65,3005 2231.65,4505 ; 2965.45,3005 2965.45,4505 ; 4465,3005 4465,4505 ; 5054.85,3005 5054.85,4505 ; 5800.65,3005 5800.65,4505 ; -534.62,3005 7125.27,3005 7125.27,4505 -534.62,4505 -534.62,3005
  text "Symbol" at -444.62,4400 h72
  text "Count" at 61.25,4400 h72
  text "Hole Size" at 651.1,4400 h72
  text "Plated" at 1770.77,4400 h72
  text "Hole Type" at 2276.65,4400 h72
  text "Drill Layer Pair" at 3010.45,4400 h72
  text "Via/Pad" at 4510,4400 h72
  text "Pad Shape" at 5099.85,4400 h72
  text "Template" at 5845.65,4400 h72
  text "155" at 61.25,4250 h60
  text "11.81mil (0.300mm)" at 651.1,4250 h60
  text "PTH" at 1770.77,4250 h60
  text "Round" at 2276.65,4250 h60
  text "Top Layer - Bottom Layer" at 3010.45,4250 h60
  text "Via" at 4510,4250 h60
  text "Rounded" at 5099.85,4250 h60
  text "v60h30m0mx0" at 5845.65,4250 h60
  text "2" at 61.25,4100 h60
  text "23.62mil (0.600mm)" at 651.1,4100 h60
  text "PTH" at 1770.77,4100 h60
  text "Slot" at 2276.65,4100 h60
  text "Top Layer - Bottom Layer" at 3010.45,4100 h60
  text "Pad" at 4510,4100 h60
  text "Rounded" at 5099.85,4100 h60
  text "r90_170h60_140r45" at 5845.65,4100 h60
  text "2" at 61.25,3950 h60
  text "23.62mil (0.600mm)" at 651.1,3950 h60
  text "PTH" at 1770.77,3950 h60
  text "Slot" at 2276.65,3950 h60
  text "Top Layer - Bottom Layer" at 3010.45,3950 h60
  text "Pad" at 4510,3950 h60
  text "Rounded" at 5099.85,3950 h60
  text "(Mixed)" at 5845.65,3950 h60
  text "2" at 61.25,3800 h60
  text "24.41mil (0.620mm)" at 651.1,3800 h60
  text "NPTH" at 1770.77,3800 h60
  text "Round" at 2276.65,3800 h60
  text "Top Layer - Bottom Layer" at 3010.45,3800 h60
  text "Pad" at 4510,3800 h60
  text "Rounded" at 5099.85,3800 h60
  text "c0hn62" at 5845.65,3800 h60
  text "3" at 61.25,3650 h60
  text "36.00mil (0.914mm)" at 651.1,3650 h60
  text "PTH" at 1770.77,3650 h60
  text "Round" at 2276.65,3650 h60
  text "Top Layer - Bottom Layer" at 3010.45,3650 h60
  text "Pad" at 4510,3650 h60
  text "Rounded" at 5099.85,3650 h60
  text "c152h91m163mx163p0" at 5845.65,3650 h60
  text "5" at 61.25,3500 h60
  text "43.31mil (1.100mm)" at 651.1,3500 h60
  text "PTH" at 1770.77,3500 h60
  text "Round" at 2276.65,3500 h60
  text "Top Layer - Bottom Layer" at 3010.45,3500 h60
  text "Pad" at 4510,3500 h60
  text "(Mixed)" at 5099.85,3500 h60
  text "(Mixed)" at 5845.65,3500 h60
  text "2" at 61.25,3350 h60
  text "78.74mil (2.000mm)" at 651.1,3350 h60
  text "PTH" at 1770.77,3350 h60
  text "Rectangle" at 2276.65,3350 h60
  text "Top Layer - Bottom Layer" at 3010.45,3350 h60
  text "Pad" at 4510,3350 h60
  text "Rounded" at 5099.85,3350 h60
  text "r600_300h200_280r150" at 5845.65,3350 h60
  text "4" at 61.25,3200 h60
  text "118.11mil (3.000mm)" at 651.1,3200 h60
  text "PTH" at 1770.77,3200 h60
  text "Round" at 2276.65,3200 h60
  text "Top Layer - Bottom Layer" at 3010.45,3200 h60
  text "Pad" at 4510,3200 h60
  text "Rounded" at 5099.85,3200 h60
  text "c500h300" at 5845.65,3200 h60
  text "175 Total" at 61.25,3050 h60
  text "Slot definitions :" at -444.62,2905.03 h60
  text "Routed Path Length" at 588.07,2905.03 h60
  text "= Calculated from tool start centre position to tool end centre position." at 1690.73,2905.03 h60
  text "Hole Length" at 588.07,2805.05 h60
  text "= Routed Path Length + Tool Size = Slot length as defined in the PCB layout" at 1280.87,2805.05 h60

## Dimensions
5275.59,2185.04 to 5276.21,-157.12 on Dimensions
-156.47,2068.66 to 5393.7,2066.93 on Dimensions

## Text inside footprints (layer, text, board x,y; h text height)
C7: Top Overlay "+" at 3489.46,303.86 h25 r90
J3: Top Overlay "1" at 271.14,7.9 h23.62
SW3: Top Overlay "B" at 4040.58,865.97 h47.24 r270; Top Overlay "A" at 4040.58,1189.3 h47.24 r270; Top Overlay "COM" at 4039.1,1060.13 h47.24 r270; Top Overlay "1" at 4495.58,1172.97 h47.24 r270